# Altium PCB PIR_V1.PcbDoc
Units mil, origin at the board's own origin, x right, y up, seen from the top; angles counter-clockwise.
Board outline 875 x 1225 mil, 2 copper layers (Top Layer, Bottom Layer); 8 components, 5 nets, 35 pads, 80 vias.
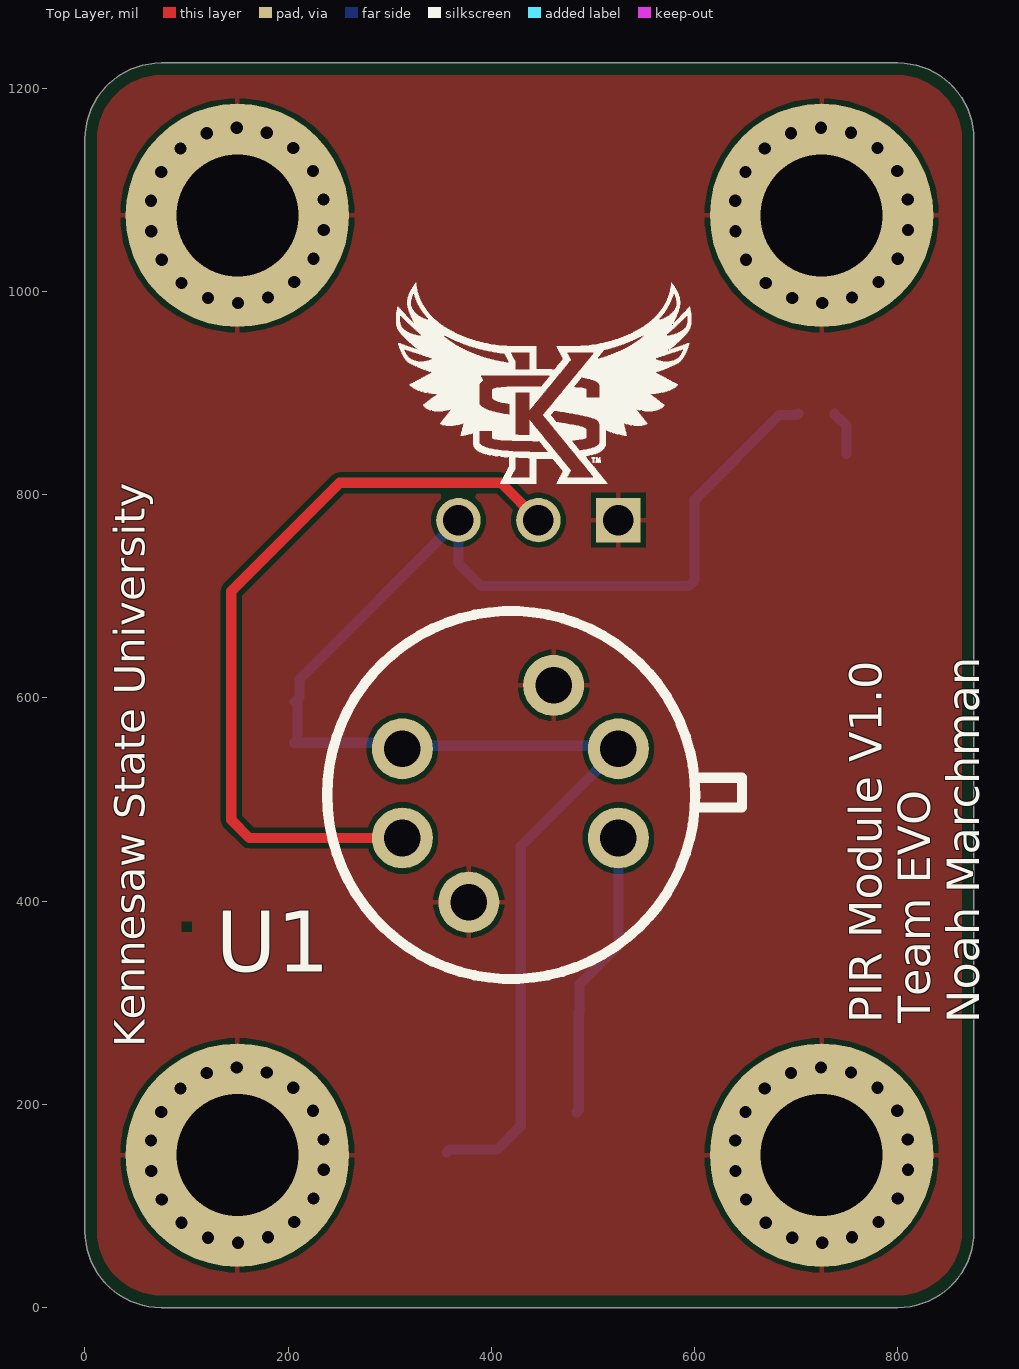
[diagram p0: Top Layer view]
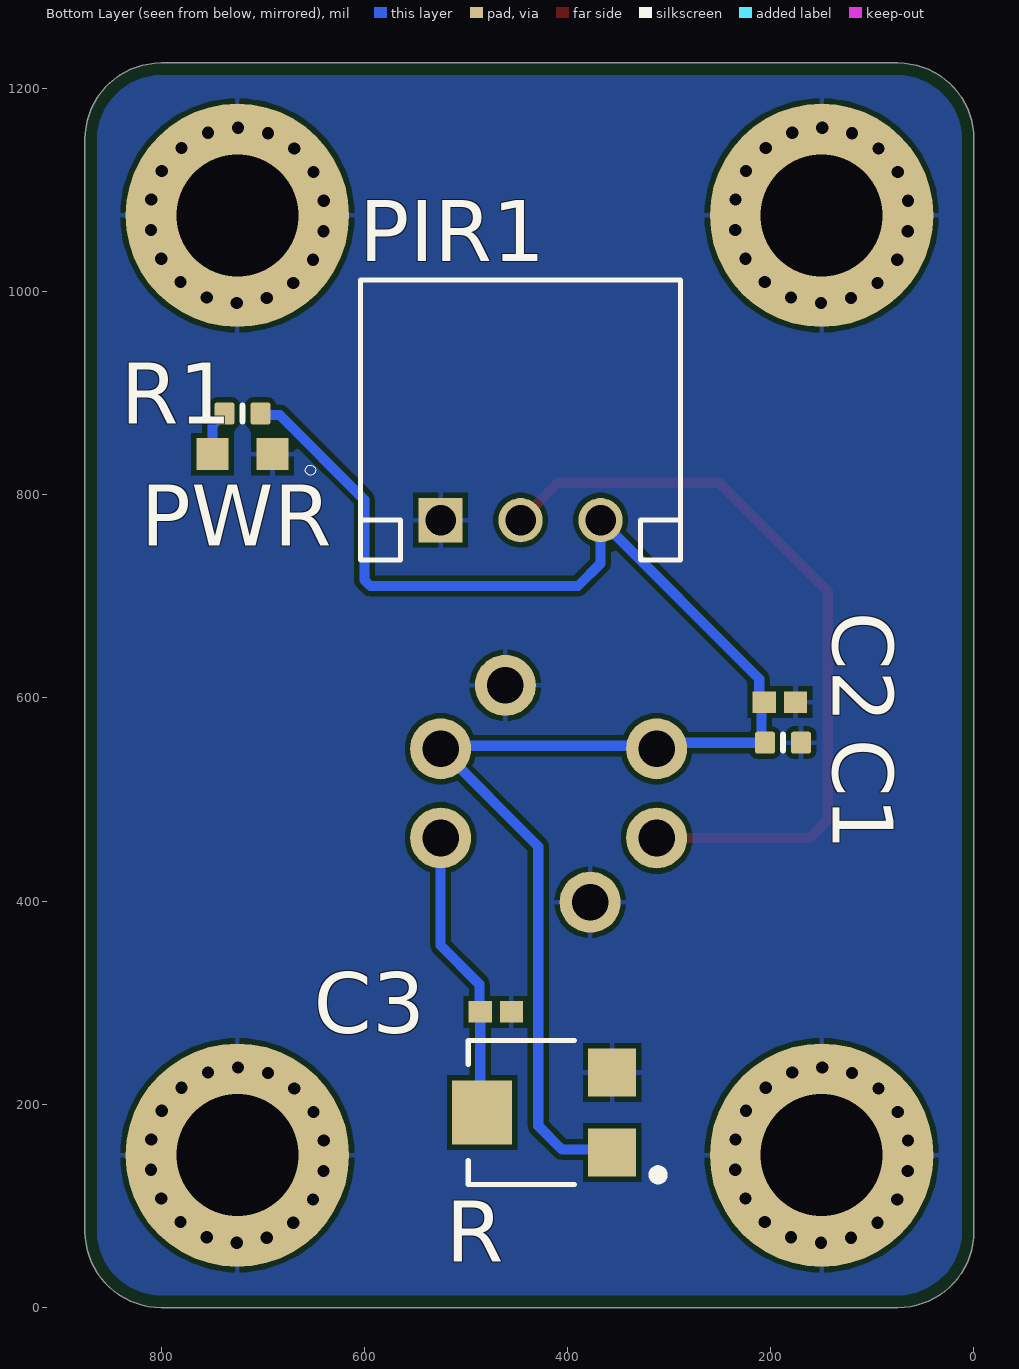
[diagram p1: Bottom Layer view, seen from below]
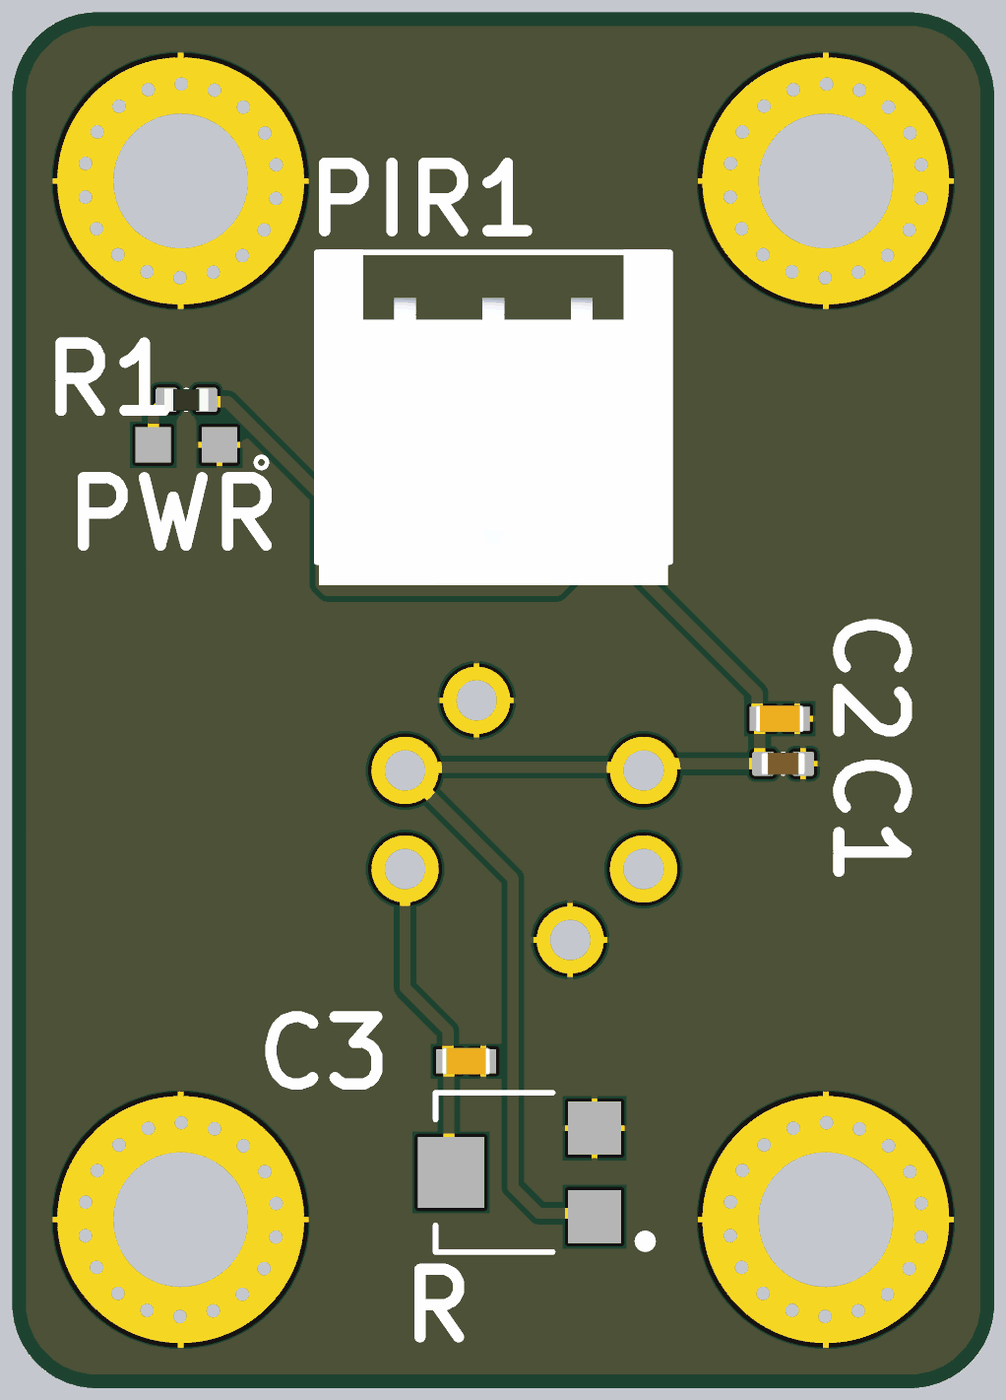
[diagram p2: 3D render of the assembled board from below, using the file's embedded part models]

## Layer stack, top to bottom
Top Solder: solder mask 0.4, Solder Resist, Dk 3.5
Top Layer: signal copper 1.4
Dielectric 1: dielectric 12.6, FR-4, Dk 4.8
Bottom Layer: signal copper 1.4
Bottom Solder: solder mask 0.4, Solder Resist, Dk 3.5

## Board outline
75,0 cw(c75,75) 0,75 0,1150 cw(c75,1150) 75,1225 800,1225 cw(c800,1150) 875,1150 875,75 cw(c800,75) 800,0

## Design rules (kind name [scope] priority, off if disabled: settings)
BoardOutlineClearance [All] p1: gap=12 ignorepadtopadclearanceinfootprint=FALSE
Clearance [All] p1: gap=5 ignorepadtopadclearanceinfootprint=FALSE except(9.84: Arc-Hole Track-Hole SMDPad-Hole THPad-Hole Via-Hole Fill-Hole Poly-Hole Region-Hole Text-Hole)
ComponentClearance [All] p1: gap=5 collisioncheckmode=3 verticalgap=5 showdistances=TRUE
DiffPairsRouting [All] p1: maxlimit=10 minlimit=5 mostfreqgap=5 toplayer_minwidth=5 toplayer_maxwidth=1000 toplayer_prefwidth=5 bottomlayer_minwidth=5 bottomlayer_maxwidth=1000 bottomlayer_prefwidth=5 maxuncoupledlength=500
Height [All] p1: minheight=0 maxheight=71497.94 prefheight=500
HoleSize [All] p1: absolutevalues=TRUE maxlimit=248.03 minlimit=11.81 maxpercent=80.000 minpercent=20.000
HoleToHoleClearance [All] p1: gap=9.84 allowstackedmicrovias=FALSE
MinimumAnnularRing [All] p1: minimumring=3
MinimumSolderMaskSliver [All] p1: minsoldermaskwidth=0
PlaneClearance [All] p1: clearance=5
PlaneConnect PlaneConnectPowerPads [InPadClass('PowerPads')] p1: planeconnectstyle=Direct reliefexpansion=20 reliefentries=4 reliefconductorwidth=10 reliefairgap=10
PlaneConnect [All] p2: pad.planeconnectstyle=Relief pad.reliefexpansion=11.81 pad.reliefentries=4 pad.reliefconductorwidth=5 pad.reliefairgap=5 via.planeconnectstyle=Direct via.reliefexpansion=11.81 via.reliefentries=4 via.reliefconductorwidth=5 via.reliefairgap=5
PolygonConnect PolygonConnectPowerPads [All vs (InPadClass('PowerPads'))] p1: connectstyle=Direct reliefconductorwidth=10 reliefentries=4 polygonreliefangle="90 Angle" airgapwidth=10
PolygonConnect [All] p2: thpad.connectstyle=Relief thpad.reliefconductorwidth=5 thpad.reliefentries=4 thpad.polygonreliefangle="90 Angle" thpad.airgapwidth=5 smdpad.connectstyle=Relief smdpad.reliefconductorwidth=5 smdpad.reliefentries=4 smdpad.polygonreliefangle="90 Angle" smdpad.airgapwidth=5 via.connectstyle=Direct via.reliefconductorwidth=5 via.reliefentries=4 via.polygonreliefangle="90 Angle" via.airgapwidth=5
RoutingVias [All] p1: holewidth=11.81 width=23.62 viastyle="Through Hole" minholewidth=11.81 minwidth=23.62 maxholewidth=23.62 maxwidth=259.84
SilkToSilkClearance [All] p1: silktosilkclearance=0
SilkToSolderMaskClearance [IsPad] p1: minsilkscreentomaskgap=5 clearancetoexposedcopper=TRUE
SolderMaskExpansion [All] p1: expansion=2.95 istentingtop=FALSE
SupplyNets "Schematic Supply Nets_1" [InNet('+3V3')] p1: voltage=0.000
SupplyNets "Schematic Supply Nets" [InNet('GND')] p2: voltage=0.000
Width [All] p1: maxlimit=1000 minlimit=5 preferedwidth=5 minimp=50.000000 maximp=50.000000 favimp=50.000000
20 further rules are at their usual default settings.

## Components (designator, comment, footprint, x,y, rotation, side; value= is the part's Value field where it differs from the comment)
C1 "Capacitor 10µF +/-40% 6.3V 0402" CAPC0402(1005)60_L 188,556 r180 bottom value=10µF
C2 "Capacitor 0.1 uF +/- 5% 16 V 0402" CAPC1005X56X25LL10T15 191,596 r180 bottom value=100nF
C3 "Capacitor 0.1 uF +/- 5% 16 V 0402" CAPC1005X56X25LL10T15 470.65,291 r180 bottom value=100nF
PIR1 "S3B-PH-K-S" S3B-PH-K-S 446.26,775 r180 bottom
PWR "LTST-C190GKT" LEDM1608X80 720,840 r0 bottom (schematic designator D1)
R "TC33X-2-104E" TRIM_TC33X-2-104E 426.91,192 r0 bottom
R1 "240R2J" RESC0402(1005)_L 720,880 r0 bottom value=300
U1 "BS612" SENSORM-TH_BS612 418.7,505.71 r0 top

## Footprints (in the part's own frame and the unit in brackets; to place one, negate y for a bottom-side part, rotate by r counter-clockwise, add the part's x,y. Pads: shape width x height; smd on the part's side, far side on the other; paste and mask are expansions set on the pad)
CAPC0402(1005)60_L [mm] "Chip Capacitor, Body 1.0x0.5mm, Height 0.6mm, IPC High Density"
  rrect25% 0.5x0.55 smd: 1(-0.45,0) 2(0.45,0)
  silkscreen extent 0,-0.2 0,0.2, body extent -0.5,-0.25 0.5,0.25, height 0.6
CAPC1005X56X25LL10T15 [mm] "Chip Capacitor, 2-Leads, Body 1.10x0.60mm, IPC High Density"
  rect 0.58x0.54 smd: 1(-0.39,0) 2(0.39,0)
  body extent -0.55,-0.3 0.55,0.3, height 0.56
LEDM1608X80 [mm]
  rect 0.8x0.8 smd: A(0.75,0) C(-0.75,0)
  silkscreen extent -1.83,0.27 -1.57,0.53
RESC0402(1005)_L [mm] "Chip Resistor, Body 1.0x0.5mm, IPC High Density"
  rrect25% 0.5x0.55 smd: 1(-0.45,0) 2(0.45,0)
  silkscreen extent 0,-0.2 0,0.2, body extent -0.5,-0.25 0.5,0.25, height 0.3
S3B-PH-K-S [mil]
  rect 43.62x43.62 / inner round 43.62 / far side rect 43.62x43.62 hole 30 mask+4.02: 1(-78.74,0)
  round 43.62 hole 30 mask+4.02: 2(0,0) 3(78.74,0)
  silkscreen extent -157,-39 157,236, body extent -156,-60 156,239, height 189
SENSORM-TH_BS612 [mil]
  round 60 hole 36: 1(106.3,-43.5) 2(106.3,44.29) 3(42.52,106.69) 4(-106.3,44.29) 5(-106.3,-43.5) 6(-40.94,-106.69)
  silkscreen extent -180,-182 228,180
TRIM_TC33X-2-104E [mm]
  rect 1.2x1.2 smd: 1(-1.8,1) 3(-1.8,-1)
  rect 1.5x1.6 smd: 2(1.45,0)
  silkscreen extent -3.07,-1.8 1.8,1.8

## Part data
C1: library part CMP-001-00074-3, "Chip Capacitor, 10µF +/-40%, 6.3V, 0402, Thickness 0.6 mm", Case/Package=0402, Max Operating Temperature=85°C, Min Operating Temperature=-55°C, Tolerance=10%, Voltage Rating=6.3V, Mounting Technology=SMT, Pins=2
C2 C3: library part CMP-001-00001-6, "Chip Capacitor, 0.1 uF, +/- 5%, 16 V, 0402 (1005 Metric)", Capacitor Type=Ceramic, Case/Package=0402, Max Operating Temperature=125°C, Min Operating Temperature=-55°C, Tolerance=5%, Voltage Rating=16V, Mounting Technology=SM, Pins=2, RoHS Compliant=True
PIR1: "Connector Header Through Hole, Right Angle 3 position 0.079 (2.00mm)", Package="NON STANDARD-3 J.S.T.", Check_prices=https://www.snapeda.com/parts/S3B-PH-K-S/JST/view-part/?ref=eda, MF="JST Sales", MP=S3B-PH-K-S, SnapEDA_Link=https://www.snapeda.com/parts/S3B-PH-K-S/JST/view-part/?ref=snap
PWR: Package=None, Availability=Unavailable, MF="{'manufacturer': u'Lite-On Inc.'}", MP=LTST-C190GKT, Price=None
R: "100 kOhms 0.1W, 1/10W J Lead Surface Mount Trimmer Potentiometer Cermet 1 Turn Top Adjustment", Package="SOD-23 Bourns", Availability=Unavailable, MF=Bourns, MP=TC33X-2-104E, Price=None, SnapEDA_Link=https://www.snapeda.com/parts/TC33X-2-104E/Bourns/view-part/50727/?ref=snap
R1: library part CMP-009-00084-2, "240R 0.063W 5% 0402 (1005 Metric)  SMD", Case/Package=0402, Power=63mW, Tolerance=5%, Mounting Technology=SMT, Pins=2
U1: "Window Shape:Rectangle Voltage - Supply:2.2V~3.7V Voltage - Supply:2.2V~3.7V Current - Supply:9.5uA Operating Temperature:-20℃~+85℃ Operating Temperature:-20℃~+85℃ Features:-", Current - Supply=9.5uA, JLCPCB Part Class="Extended Part", LCSC Part Name=数字智能热释电红外传感器, Manufacturer=森霸, Operating Temperature=-20℃~+85℃, Voltage - Supply=2.2V~3.7V, AddInBom=yes, ConvertToPcb=yes, Datasheet=https://item.szlcsc.com/datasheet/BS612/365441.html, Device=BS612, Features=-, FootprintName=SENSORM-TH_BS612, ManufacturerPart=BS612, ModelId=09a3d265544b411fb2cc04346c41faa3ÂŽ0819f05c4eef4c71ace90d822a990e87, ModelName=SENSORM-TH_BS612, ModelTransform=387.7945,358.17739,0,0,0,0,13.78,0.001,-196.85, Supplier=LCSC, Supplier Footprint=插件, SupplierPart=C389589, Symbol=BS612, Window Shape=Rectangle

## Free pads (board coordinates)
  round 0 on Top Overlay: 2(75,1150) 3(75,1150) 4(75,1150) 5(75,1150) 6(75,1150) 7(75,1150) 8(75,1150) 9(75,1150) 10(75,1150)
  round 220 hole 120 mask+4.02: 11(150,1075) 12(150,150) 14(725,1075) 15(725,150)

## Via types
v1: diameter 24, hole 12, Top Layer to Bottom Layer, tented both sides, 80 vias

## Nets (pads, with @x,y where several pads share a name; then routed paths per layer and width w, separated by ;. In a path a pad name is that pad's centre, name@x,y a point inside that pad or via, vN(x,y) a via of type N, cw(c..) or ccw(c..) an arc to the next point about the centre after c; other vN are vias at no path point)
+3V3: C1.1 C2.1 PIR1.3 R1.1 R.1 U1.2 U1.4 | length 1606
  Bottom Layer w10: U1.4 306.4,556 C1.1 209.04,559.32 209.04,593.32 C2.1 211.29,600.94 211.29,618.77 PIR1.3 367.52,732.48 389.75,710.25 594.14,710.25 600,716.11 600,795.17 683.34,878.5 700.79,878.5 R1.1 ; U1.4@315.4,553 522,553 U1.2 428.87,453.87 428.87,178.87 405.63,155.63 359.05,155.63 R.1
GND: C1.2 C2.2 C3.2 pad.11 pad.12 pad.14 pad.15 PIR1.1 PWR.C R.3 U1.3 U1.6
  other v1: 150.6,63.75 725.6,63.75 121.06,68.74 180.07,69.15 696.06,68.74 755.07,69.15 95.02,83.54 205.9,84.31 670.02,83.54 780.9,84.31 75.6,106.35 650.6,106.35 225,107.39 800,107.39 65.16,134.43 640.16,134.43 235.05,135.61 810.05,135.61 64.95,164.39 639.95,164.39 234.84,165.57 809.84,165.57 75,192.61 650,192.61 224.4,193.65 799.4,193.65 94.1,215.69 204.98,216.46 669.1,215.69 779.98,216.46 119.93,230.85 119.93,230.85 178.94,231.26 694.93,230.85 694.93,230.85 753.94,231.26 149.4,236.25 149.4,236.25 724.4,236.25 724.4,236.25 150.6,988.75 725.6,988.75 121.06,993.74 180.07,994.15 696.06,993.74 755.07,994.15 95.02,1008.54 205.9,1009.31 670.02,1008.54 780.9,1009.31 75.6,1031.35 650.6,1031.35 225,1032.39 800,1032.39 65.16,1059.43 640.16,1059.43 235.05,1060.61 810.05,1060.61 64.95,1089.39 639.95,1089.39 234.84,1090.57 809.84,1090.57 75,1117.61 650,1117.61 224.4,1118.65 799.4,1118.65 94.1,1140.69 204.98,1141.46 669.1,1140.69 779.98,1141.46 119.93,1155.85 119.93,1155.85 178.94,1156.26 694.93,1155.85 694.93,1155.85 753.94,1156.26 149.4,1161.25 149.4,1161.25 724.4,1161.25 724.4,1161.25
NetC3_1: C3.1 R.2 U1.1 | length 286.9
  Bottom Layer w10: R.2 486,194 C3.1 ; C3.1@486.79,291 486.79,318.23 525,356.44 U1.1
NetD1_A: PWR.A R1.2 | length 45.5
  Bottom Layer w10: R1.2 737.72,879.02 742.56,874.17 743.54,874.17 749.53,868.19 PWR.A
NetPIR1_2: PIR1.2 U1.5 | length 762.5
  Top Layer w10: U1.5 161.8,462.2 144,480 144,705 250.81,811.81 409.45,811.81 PIR1.2

## Polygon pours and split planes (outlines as drawn)
GND on Bottom Layer "GND_L02_P001" (solid, pour order 1): 75,0 cw(c75,75) 0,75 0,1150 cw(c75,1150) 75,1225 800,1225 cw(c800,1150) 875,1150 875,75 cw(c800,75) 800,0
GND on Top Layer "GND_L01_P002" (solid, pour order 2): 77.5,0 cw(c77.5,75) 2.5,75 2.5,1150 cw(c77.5,1150) 77.5,1225 802.5,1225 cw(c802.5,1150) 877.5,1150 877.5,75 cw(c802.5,75) 802.5,0

## Other copper
Top Layer:

## Silkscreen, mask and mechanical layers (free items; w line width, h text height)
Top Overlay:
  drawing of 3 lines, arcs and shapes, not listed
  text "PIR Module V1.0 / Team EVO / Noah Marchman" at 880,280 h32 r90
  text "Kennesaw State University" at 59,256 h30 r90
Top Assembly:
  the board outline again, w10

## Dimensions
75,0 to 75,1225 on Top Assembly
0,1150 to 875,1150 on Top Assembly